# Altium PCB PCB1.PcbDoc
Units mil, origin at the board's own origin, x right, y up, seen from the top; angles counter-clockwise.
Board outline 2372.23 x 2372.23 mil, 2 copper layers (Top Layer, Bottom Layer); 14 components, 9 nets, 49 pads, 4 vias.
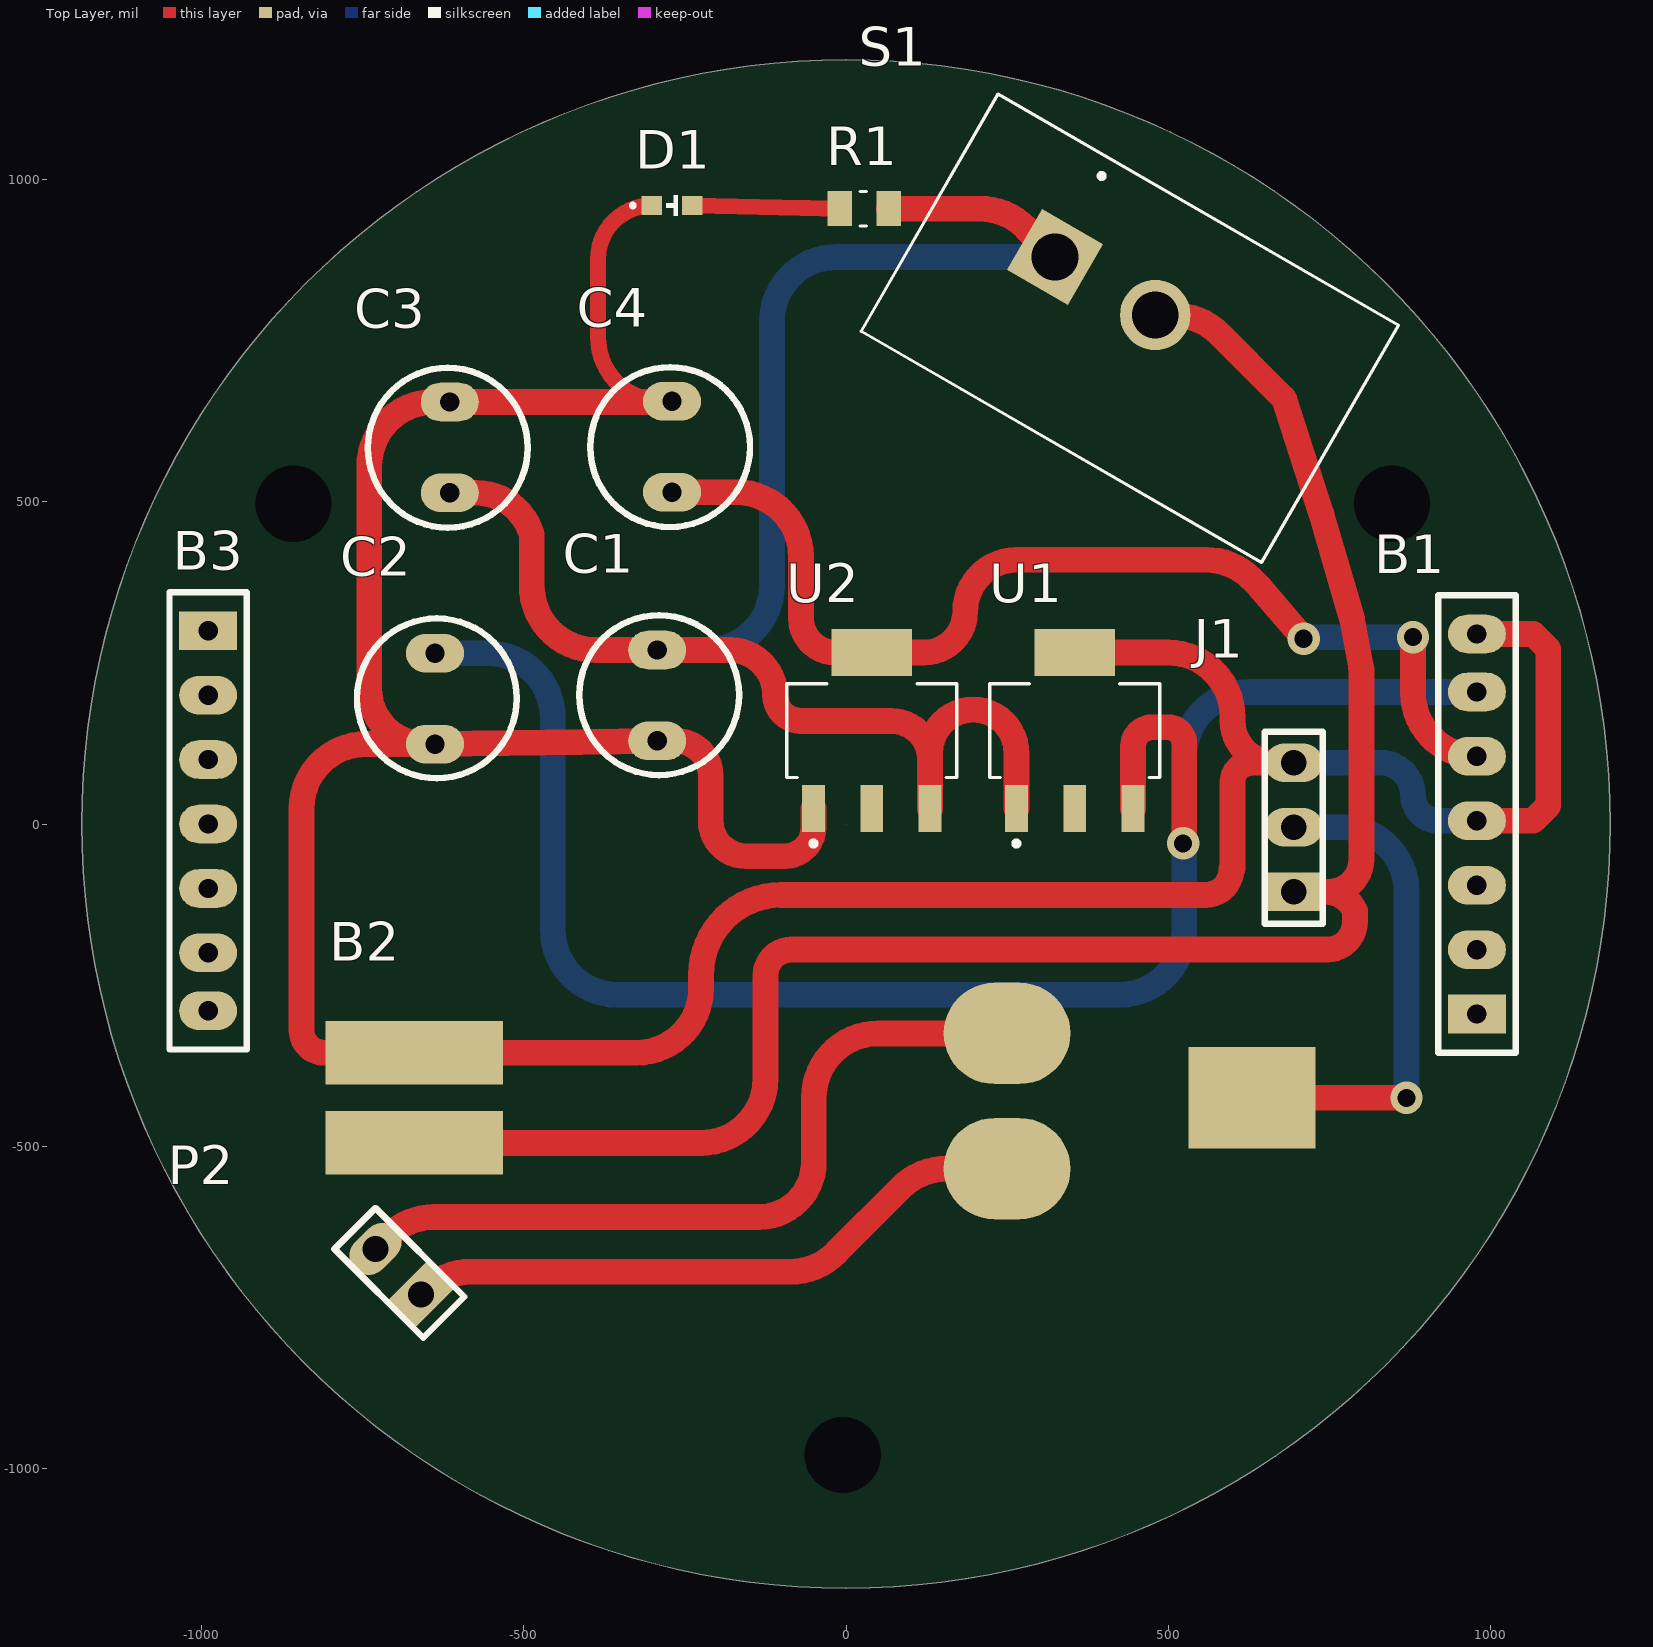
[diagram p0: Top Layer view]
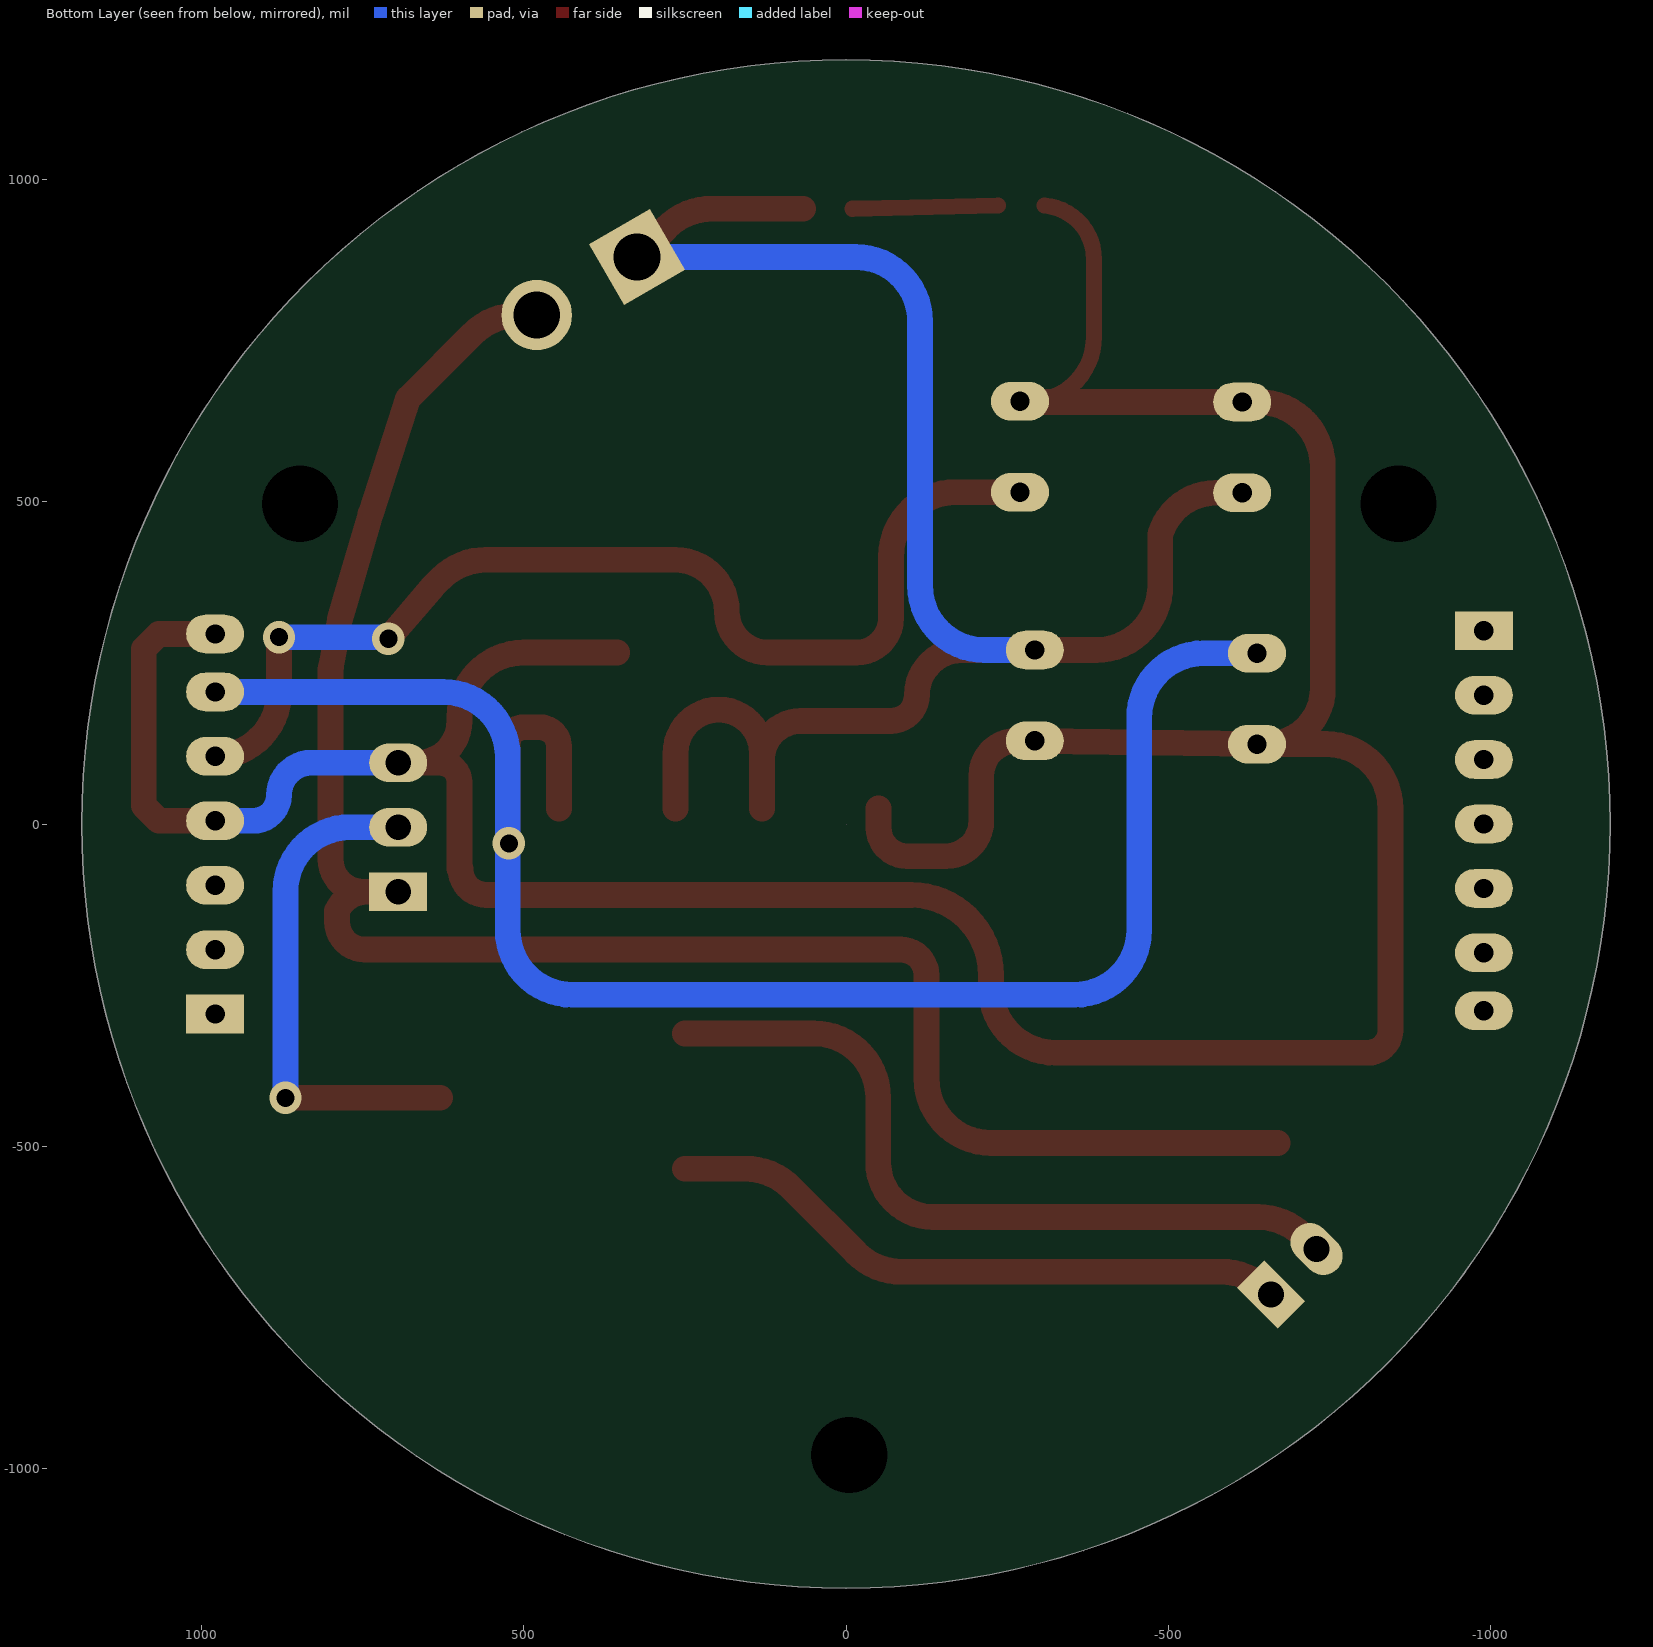
[diagram p1: Bottom Layer view, seen from below]
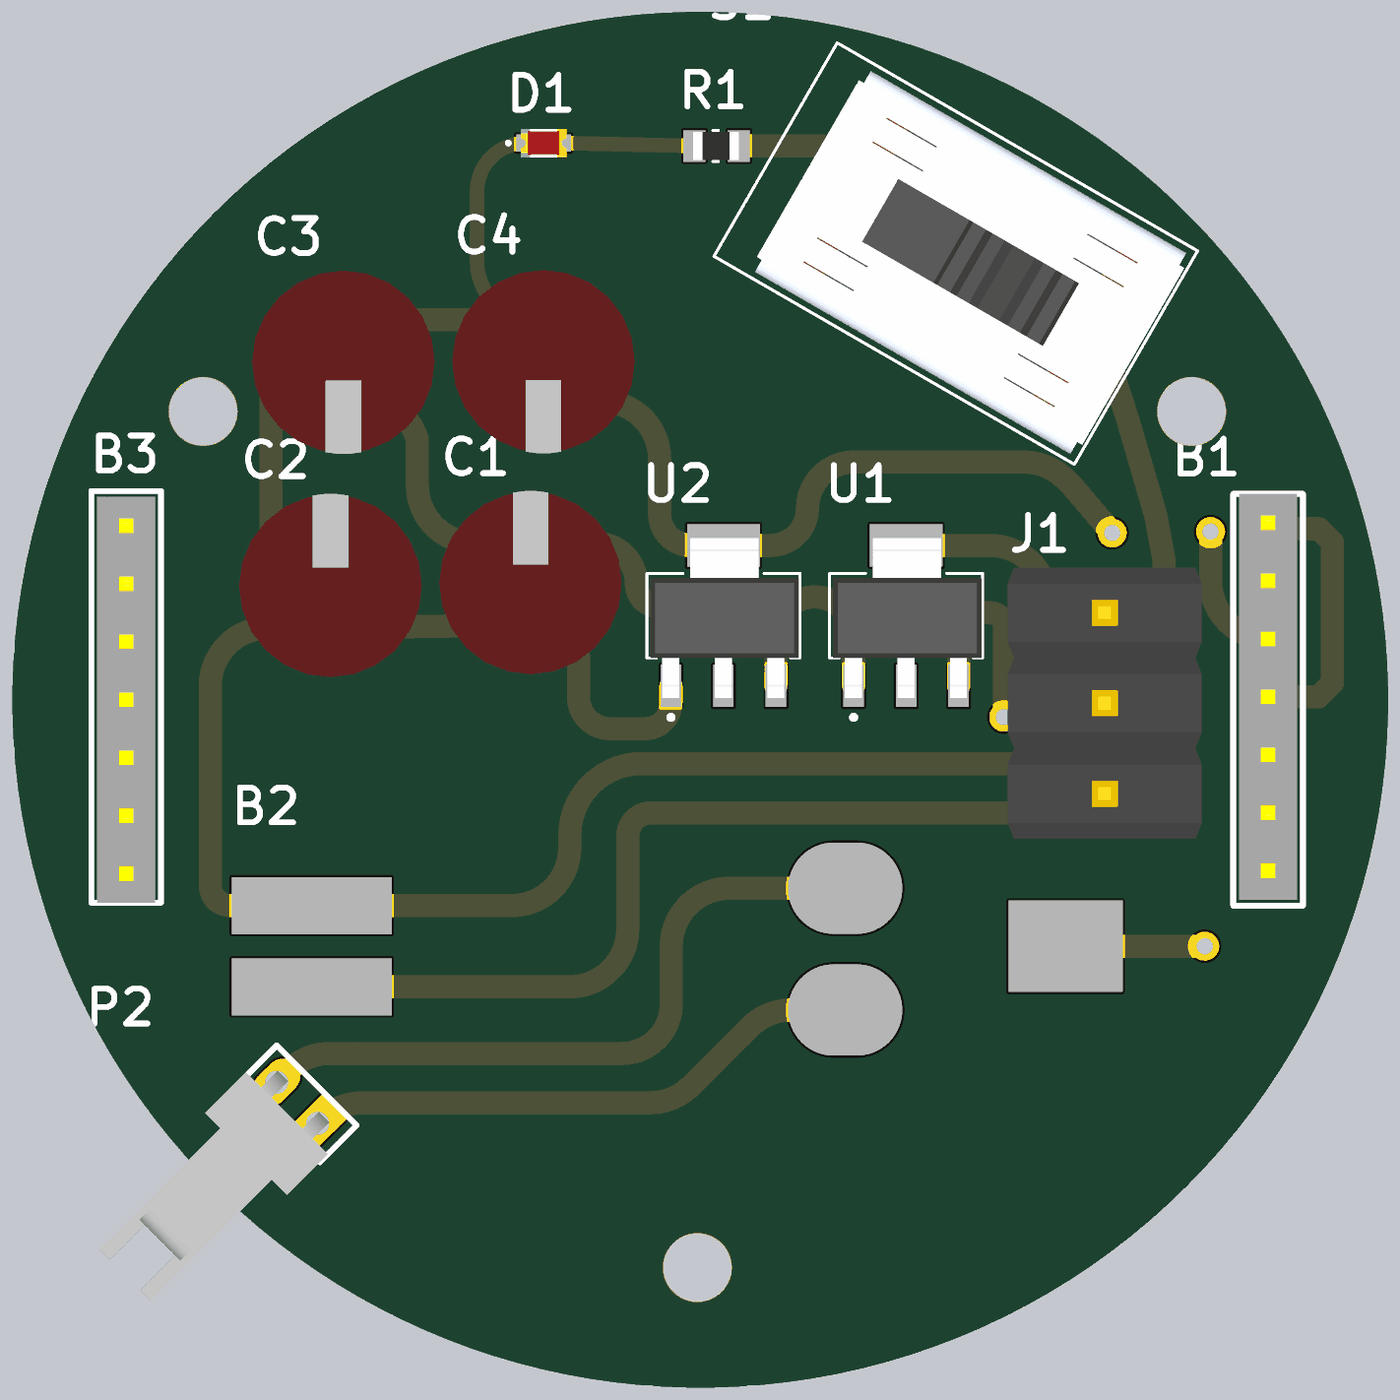
[diagram p2: 3D render of the assembled board from above, using the file's embedded part models]

## Layer stack, top to bottom
Top Solder: solder mask 0.4, Solder Resist, Dk 3.5
Top Layer: signal copper 1.4
Dielectric 1: dielectric 12.6, FR-4, Dk 4.8
Bottom Layer: signal copper 1.4
Bottom Solder: solder mask 0.4, Solder Resist, Dk 3.5

## Board outline
-841.2,-836.22 cw(c0,0) -1186.12,0 cw(c0,0) 0,1186.12 cw(c0,0) 836.2,841.22 cw(c0,0) 1186.12,0 cw(c0,0) 0,-1186.12 cw(c0,0)
cut-out: 0,0

## Design rules (kind name [scope] priority, off if disabled: settings)
Clearance [All] p1: gap=30 ignorepadtopadclearanceinfootprint=FALSE
PolygonConnect [All] p1: connectstyle=Relief reliefconductorwidth=10 reliefentries=4 polygonreliefangle="90 Angle" airgapwidth=10
RoutingVias [All] p1: holewidth=28 width=50 viastyle="Through Hole" minholewidth=28 minwidth=50 maxholewidth=28 maxwidth=50
SolderMaskExpansion [All] p1: expansion=4 istentingtop=FALSE
Width [All] p1: maxlimit=45 minlimit=25 preferedwidth=40
30 further rules are at their usual default settings.

## Components (designator, comment, footprint, x,y, rotation, side; value= is the part's Value field where it differs from the comment)
B1 "RIGHT BUS" "bus left" 979.25,-295 r90 top
B2 "BMS 2S" "BMS 2S" -50,-435 r90 top
B3 "LEFT BUS" "bus right" -990,300 r270 top
C1 "Cap" capacitor -290,200 r90 top value=100pF
C2 "Cap" capacitor -635,195 r90 top value=100pF
C3 "Cap" capacitor -618,584 r270 top value=100pF
C4 "Cap" capacitor -273,585 r270 top value=100pF
D1 "Super Red, 2V, 140°" "LED red" -270,960 r0 top
J1 "Header 1X3" "Header 1X3" 695,-55 r90 top
P2 "Header 1X2" "Header 2 pin" -695,-695 r135 top
R1 "RESISTOR" RESISTOR 26.61,955 r180 top
S1 "SWITCH" SWITCH 465.62,625.1 r240 top
U1 "7805" 7805 355,145 r90 top
U2 "ASM 1117" 7805 40,145 r90 top

## Footprints (in the part's own frame and the unit in brackets; to place one, negate y for a bottom-side part, rotate by r counter-clockwise, add the part's x,y. Pads: shape width x height; smd on the part's side, far side on the other; paste and mask are expansions set on the pad)
7805 [mm]
  rect 1.86x0.9 smd: 1(-3.075,2.3) 2(-3.075,0) 3(-3.075,-2.3)
  rect 1.86x3.19 smd: 4(3.075,0)
  silkscreen extent -4.55,-3.35 1.85,3.35, body extent -3.6,-3.3 3.4,3.2, height 1.68
"BMS 2S" [mm]
  rect 2.5x7 smd: 1(-1.524,15.748) 2(2.032,15.748)
  rect 4x5 smd: 3(0.254,-17.272)
  oval 4x5 smd: 4(-2.54,-7.62) 5(2.794,-7.62)
"bus left" [mil]
  rect 60x90 hole 30: 1(0,0)
  oval 60x90 hole 30: 2(100,0) 3(200,0) 4(300,0) 5(400,0) 6(500,0) 7(590,0)
  silkscreen extent -60,-60 650,60, body extent -50,-50 650,50, height 621
"bus right" [mil]
  rect 60x90 hole 30: 1(0,0)
  oval 60x90 hole 30: 2(100,0) 3(200,0) 4(300,0) 5(400,0) 6(500,0) 7(590,0)
  silkscreen extent -60,-60 650,60, body extent -50,-50 650,50, height 621
capacitor [mil]
  oval 60x90 hole 30: 1(-71,3) 2(70,3)
  silkscreen extent -124,-124 124,124, body extent -156,-155 160,160, height 493
"Header 1X3" [mil]
  rect 60x90 hole 40: 1(-50,0)
  oval 60x90 hole 40: 2(50,0) 3(150,0)
  silkscreen extent -100,-45 198,45, body extent -185,-170 283,165, height 429
"Header 2 pin" [mil]
  rect 60x90 hole 40: 1(-50,0)
  oval 60x90 hole 40: 2(50,0)
  silkscreen extent -100,-45 95,45, body extent -100,-15 100,420, height 230
"LED red" [mm] "SMD Mono-color Chip LED, body 1.6x0.8mm"
  rect 0.8x0.75 smd: 1(-0.8,0) 2(0.8,0)
  silkscreen extent -1.62,-0.4 0.22,0.4, body extent -1,-0.63 1,0.62, height 1.1
RESISTOR [mm]
  rect 0.97x1.38 smd: 1(-1.016,0) 2(0.93,0)
  silkscreen extent -0.12,-0.68 0.12,0.68, body extent -1.02,-0.62 0.98,0.62, height 0.61
SWITCH [mm]
  rect 2.775x2.775 / inner round 2.775 / far side rect 2.775x2.775 hole 1.85: 1(-3.81,-6.35)
  round 2.775 hole 1.85: 2(-3.81,-1.778)
  silkscreen extent -8.26,-11.5 2.54,6.73, body extent -7.92,-9.86 2.24,6.6, height 13.22

## Part data
B1: library part "BUS right"
B3: library part "BUS left"
C1 C2 C3 C4: "Capacitor", LatestRevisionDate=17-Jul-2002, LatestRevisionNote="Re-released for DXP Platform.", PackageDescription="Radial Cap, Thru-Hole; 2 Leads; 0.3 in Pin Spacing", PackageReference=RAD-0.3, Published=8-Jun-2000, Publisher="Altium Limited"
D1: library part "LED red", "WL-SMCD Mono-color Chip LED Diffused, SMT, size 0603, Super Red, 2V, 140°", Case/Size Code=0603, Emitting Color="Super Red", Forward Voltage=2V, Manufacturer="Wurth Elektronik", Manufacturer Part Number=150060SS55040, Operating Temperature Max=85°C, Operating Temperature Min=-40°C, Category="Signal LEDs", Chip Technology=AlInGaP, ComponentLink1Description="Website Link", ComponentLink1URL=https://www.we-online.com/redexpert/article/150060SS55040?ad, ComponentLink2Description="Datasheet Link", ComponentLink2URL=https://www.we-online.com/redexpert/spec/150060SS55040?ad, Dominant Wavelength=630nm, Height=0.4mm, Length=1.6mm, Luminous Intensity=70mcd, Match Code=WL-SMCD, Mount="Surface Mount", Packaging="Tape and Reel", Peak Wavelength=645nm, Viewing Angle=140°, Width=0.8mm
R1: "RES SMD 270 OHM 5% 0.4W 0805", Package=None, Availability=Unavailable, MP=ESR10EZPJ271, Price=None
S1: "Slide Switch SPST Through Hole", Package=None, Availability="In Stock", Check_prices=https://www.snapeda.com/parts/S101031MS02Q/C%2526K/view-part/?ref=eda, MF=C&K, MP=S101031MS02Q, Price=None, Purchase-URL=https://pricing.snapeda.com/search/part/S101031MS02Q/?ref=eda, SnapEDA_Link=https://www.snapeda.com/parts/S101031MS02Q/C%2526K/view-part/?ref=snap
U1: "Linear Voltage Regulator IC 1 Output 1A SOT-223", Package="SOT-223 Diodes Inc.", Check_prices=https://www.snapeda.com/parts/AZ1117EH-5.0TRG1/Diodes%20Inc./view-part/795858/?ref=eda, Digi-Key_Part_Number=AZ1117EH-5.0TRG1DICT-ND, MF="Diodes Inc.", MP=AZ1117EH-5.0TRG1, Purchase-URL=https://pricing.snapeda.com/search/part/AZ1117EH-5.0TRG1/?ref=eda, SnapEDA_Link=https://www.snapeda.com/parts/AZ1117EH-5.0TRG1/Diodes%20Inc./view-part/795858/?ref=snap

## Free pads (board coordinates)
  round 0 hole 118.11: 10(-857.39,497.13) 10(-5,-979.25) 10(847.39,497.13)

## Via types
v1: diameter 50, hole 28, Top Layer to Bottom Layer, 4 vias

## Nets (pads, with @x,y where several pads share a name; then routed paths per layer and width w, separated by ;. In a path a pad name is that pad's centre, name@x,y a point inside that pad or via, vN(x,y) a via of type N, cw(c..) or ccw(c..) an arc to the next point about the centre after c; other vN are vias at no path point)
GND: B1.4 B1.7 B2.2 C1.1 C2.1 C3.1 C4.1 D1.1 J1.3 U1.4 U2.1 | length 5920.4
  Top Layer w25: D1.1@-308.15,959.73 ccw(c-301.5,876.5) -385,876.5 -385,756 ccw(c-285,756) C4.1@-285,656
  Top Layer w40: C4.1@-285,656 C4.1 cw(c-271,656) -271,655 C3.1 -640,655 ccw(c-640,555) -740,555 -740,210 ccw(c-654,210) C2.1@-654,124 ; U2.1 -50.55,-5.55 cw(c-95,-5.55) -95,-50 -155,-50 cw(c-155,5) -210,5 -210,75 ccw(c-264,75) -264,129 C1.1 ccw(c-293,127) -293.06,129 -295.03,128.97 C2.1 C2.1@-654,124 ; U1.4 500,266.06 cw(c500,166.06) 600,166.06 600,160 ccw(c665,160) J1.3@665,95 ; J1.3 J1.3@665,95 ; B1.4 1066.57,5 1090,28.43 1090,271.57 1066.57,295 B1.7 ; C2.1@-654,124 -745,124 ccw(c-745,24) -845,24 -845,-320 ccw(c-810,-320) -810,-355 B2.2 -325,-355 ccw(c-325,-255) -225,-255 -225,-234.04 cw(c-100.96,-234.04) -100.96,-110 558.34,-110 ccw(c558.34,-70) 598.34,-70 ccw(c598.34,-68.34) 600,-68.34 600,65 cw(c630,65) 630,95 J1.3@665,95
  Bottom Layer w40: J1.3 830,95 cw(c830,45) 880,45 ccw(c920,45) 920,5 B1.4
NetB1_5: B1.5 C4.2 U2.4 | length 1707.3
  Top Layer w40: C4.2 -170,515 cw(c-170,415) -70,415 -70,320 ccw(c-16.06,320) -16.06,266.06 U2.4 121.06,266.06 ccw(c121.06,330) 185,330 cw(c265,330) 265,410 558.58,410 cw(c558.58,310) 629.29,380.71 641.09,368.91 v1(710.36,287.53) ; v1(880,290) 880,204.25 ccw(c979.25,204.25) B1.5
  Bottom Layer w40: v1(710.36,287.53) 720,290 v1(880,290)
NetB1_6: B1.6 C2.2 U1.3 | length 2808
  Top Layer w40: U1.3 445.55,120.55 cw(c475,120.55) 475,150 500,150 cw(c500,125) 525,125 525,-18.58 cw(c485,-18.58) v1(523.34,-30)
  Bottom Layer w40: C2.2 -555,265 cw(c-555,165) -455,165 -455,-165 ccw(c-355,-165) -355,-265 425,-265 ccw(c425,-165) 525,-165 525,-41.42 ccw(c485,-41.42) v1(523.34,-30) ; v1@525,-30 525,105 cw(c625,105) 625,205 B1.6
NetB2_1: B2.1 J1.1 S1.2 | length 2914.8
  Top Layer w40: B2.1 -225,-495 ccw(c-225,-395) -125,-395 -125,-235 cw(c-85,-235) -85,-195 746.46,-195 ccw(c746.46,-151.46) 790,-151.46 790,-135 ccw(c743.84,-155.52) 743.84,-105 ; S1.2 508.58,790 cw(c508.58,690) 579.29,760.71 673.32,666.68 680,660 685.04,644.88 737.99,481.05 738.33,480 739.93,473.93 776.84,347.75 785.36,318.59 799.32,243.63 800,240 800,-55 cw(c750,-55) 750,-105 J1.1
NetB2_3: B2.3 J1.2 | length 792.1
  Top Layer w40: B2.3 v1(870,-425)
  Bottom Layer w40: J1.2 770,-5 cw(c770,-105) 870,-105 v1(870,-425)
NetB2_4: B2.4 P2.1 | length 977.7
  Top Layer w40: P2.1 -653.58,-724.29 cw(c-582.87,-795) -582.87,-695 -86.42,-695 ccw(c-86.42,-595) -15.71,-665.71 85.71,-564.29 cw(c156.42,-635) 156.42,-535 B2.4
NetB2_5: B2.5 P2.2 | length 1202.2
  Top Layer w40: P2.2 -710,-639.29 cw(c-639.29,-710) -639.29,-610 -135,-610 ccw(c-135,-525) -50,-525 -50,-425 cw(c50,-425) 50,-325 B2.5
NetC1_2: C1.2 C3.2 R1.1 S1.1 U1.1 U2.3 | length 2817.8
  Top Layer w40: C3.2 -573.96,514 cw(c-573.96,424.44) -487.88,449.17 -487.88,370 ccw(c-387.88,370) -387.88,270 C1.2 -180,270 cw(c-180,200) -110,200 ccw(c-70,200) -70,160 70,160 cw(c70,99.45) 126,122.47 cw(c70,99.45) 130.55,99.45 ; R1.1 207.69,955 cw(c207.69,855) 278.4,925.71 S1.1 ; U2.3 130.55,99.45 ; U1.1 264.45,110.55 ccw(c197.5,110.55) 197.5,177.5 ccw(c197.5,110.55) 130.55,110.55 130.55,99.45
  Bottom Layer w40: C1.2 -215,270 ccw(c-215,370) -115,370 -115,780 cw(c-15,780) -15,880 S1.1
NetD1_2: D1.2 R1.2 | length 225.8
  Top Layer w25: D1.2@-235.75,960 -101.62,957.03 R1.2
pads on no net: B1.1 B1.2 B1.3 B3.1 B3.2 B3.3 B3.4 B3.5 B3.6 B3.7 U1.2 U2.2

## Silkscreen, mask and mechanical layers (free items; w line width, h text height)
Mechanical 1:
  circle w10: c-5,5 r1181.1
Undefined:
  circle w10: c0,0 r1181.1